# Altium PCB CW341_KintexUSTarget.PcbDoc (part 7 of 7)
Units mil, origin at the board's own origin, x right, y up, seen from the top; angles counter-clockwise.
Board outline 4566.97 x 5485 mil, 6 copper layers (Top Layer, Layer 2 (GND), Layer 3 (sig), Layer 4 (sig), Layer 5 (PWR), Bottom Layer), stack 61.068 mil thick; 157 components, 262 nets, 1869 pads, 1478 vias.
Unrouted connection lines stored in the file: 128.
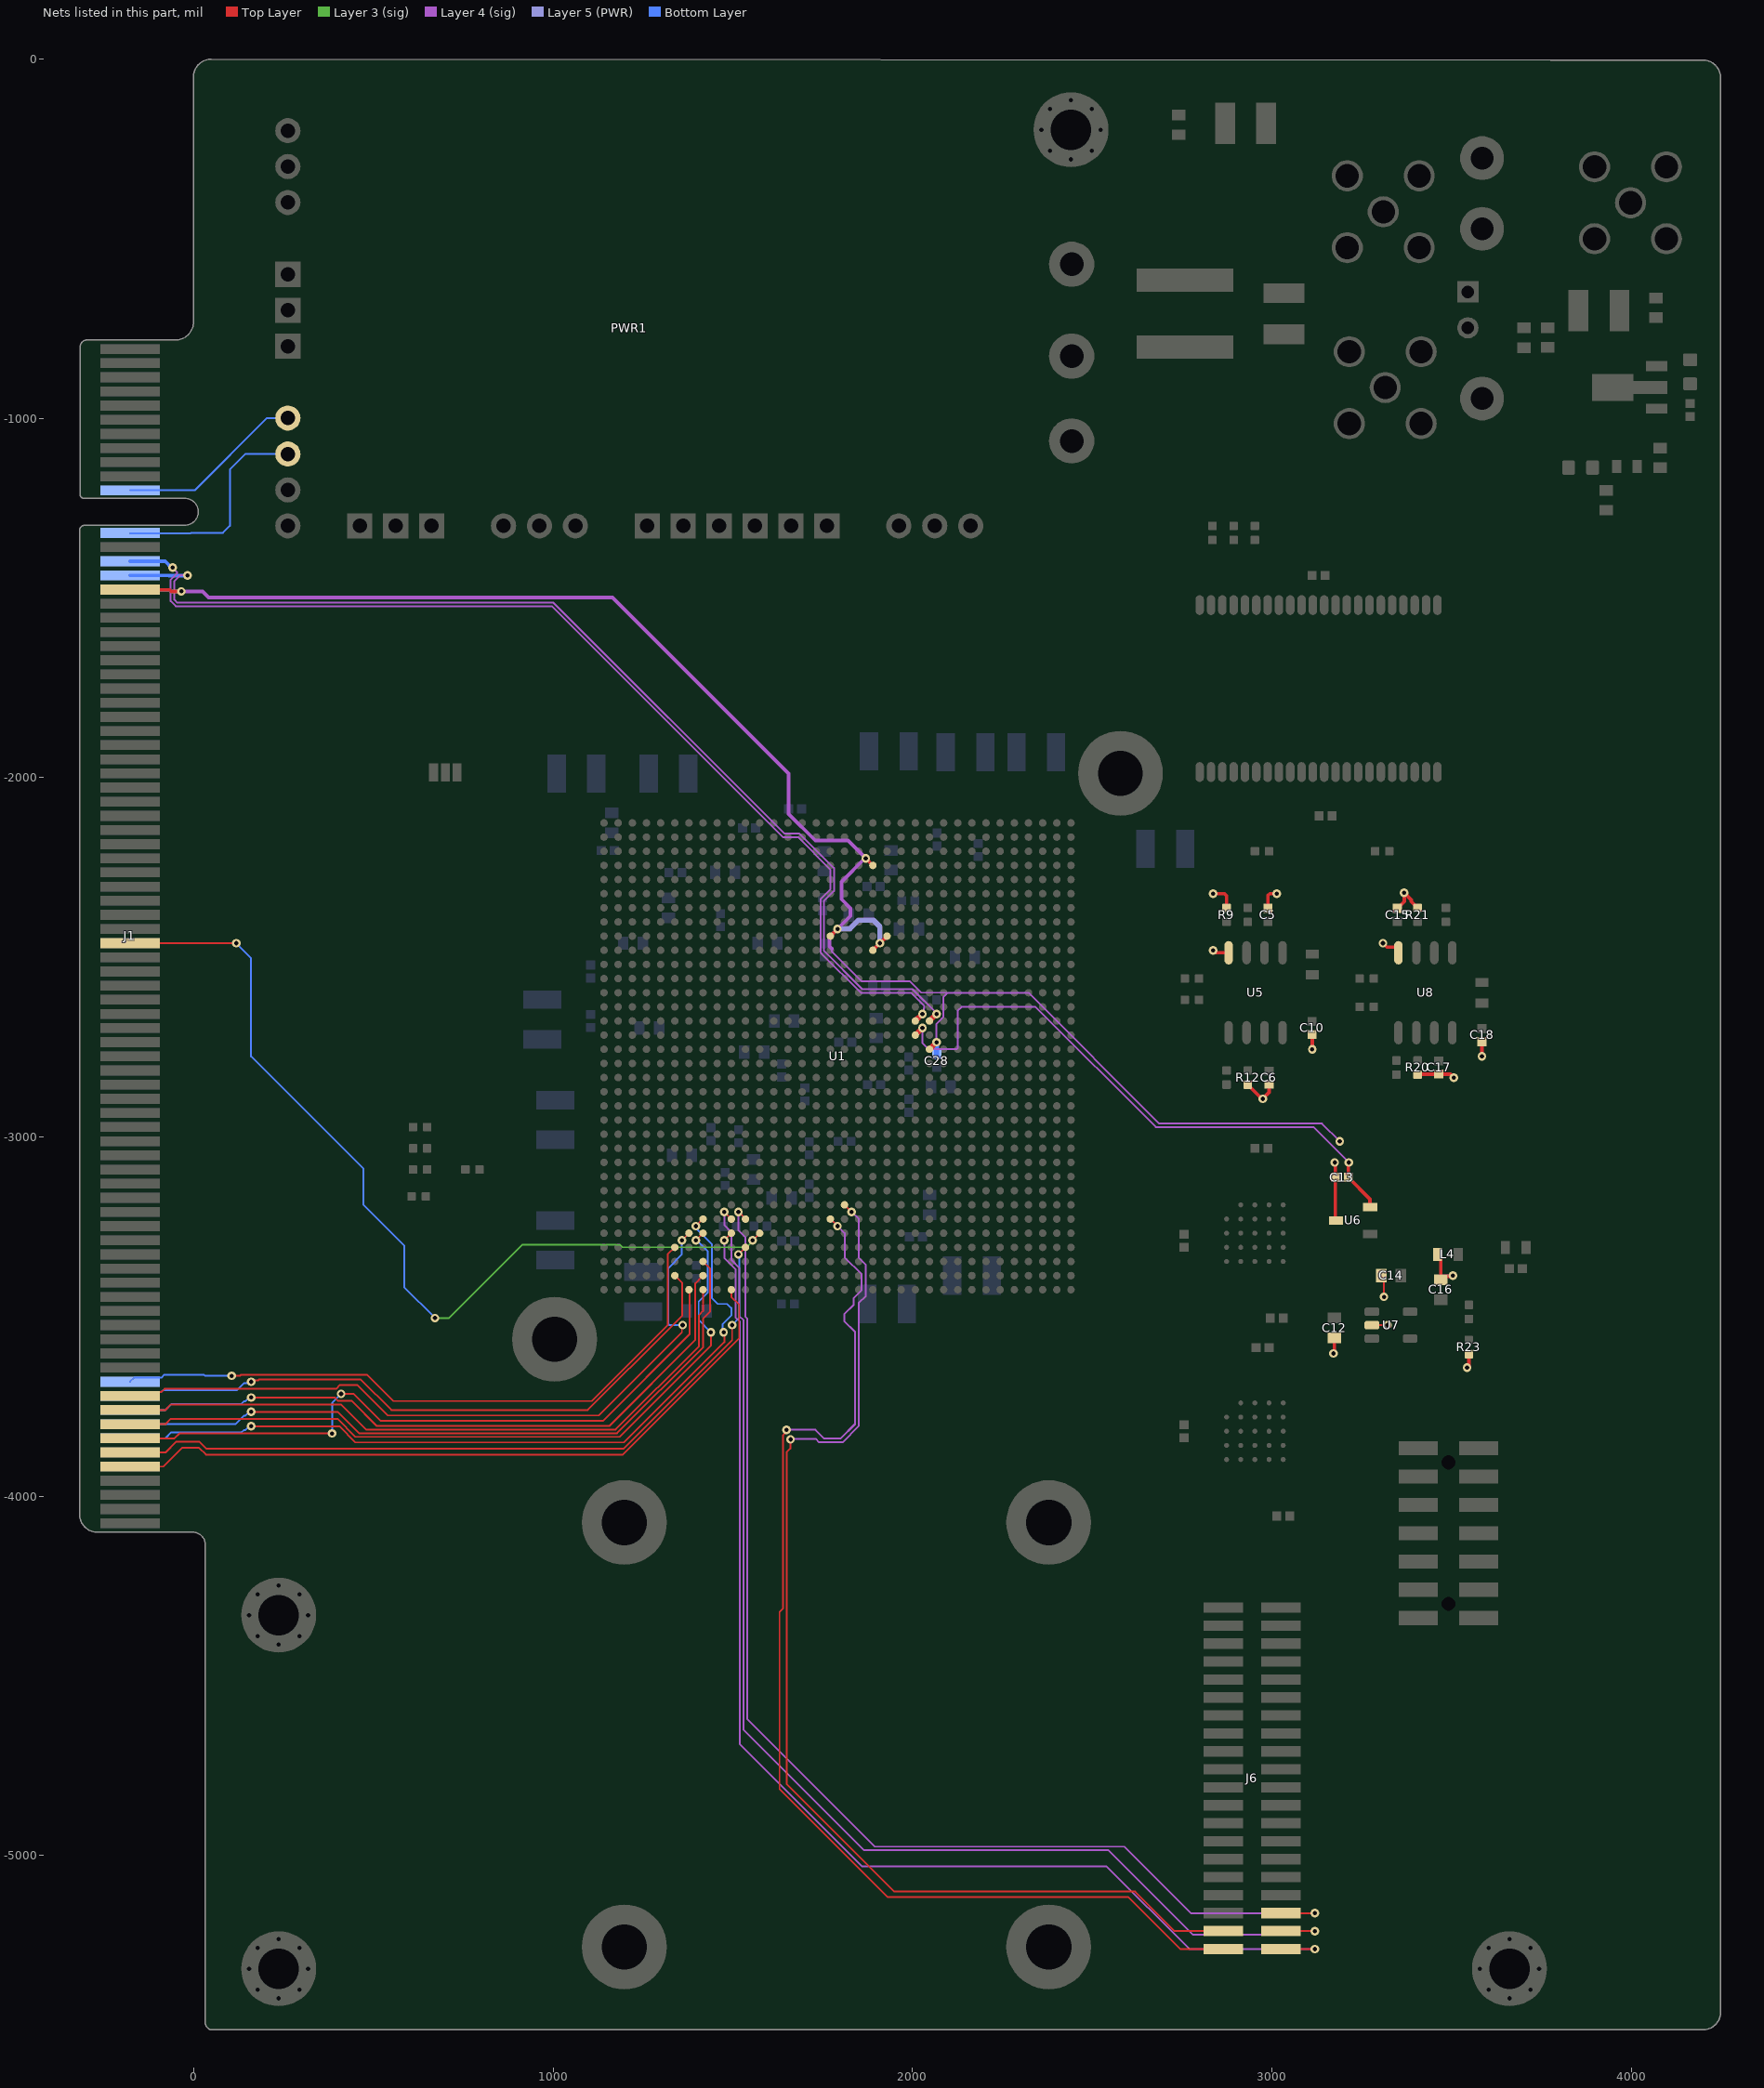
[diagram p10: the nets of this part, all layers, seen from the top]

## Via types
v1: diameter 24, hole 12, Top Layer to Bottom Layer, tented both sides, 1463 vias
v2: diameter 24, hole 10, Top Layer to Bottom Layer, tented both sides, 15 vias

## Nets (pads, with @x,y where several pads share a name; then routed paths per layer and width w, separated by ;. In a path a pad name is that pad's centre, name@x,y a point inside that pad or via, vN(x,y) a via of type N, cw(c..) or ccw(c..) an arc to the next point about the centre after c; other vN are vias at no path point) (continued)
USERIOA-36: J6.36 U1.F24 | length 3348.1
  Top Layer w5: v1(1515.75,-3208.66) U1.F24@1535.43,-3228.35 ; J6.36@3025,-5160 v1(3120,-5160)
  Layer 4 (sig) w5: v1(1515.75,-3208.66) 1515.75,-3259.82 1535.25,-3279.32 1535.25,-3364.75 1535,-3365 1535,-3500 1540,-3505 1540,-4620 1895,-4975 2590,-4975 2775,-5160 v1(3120,-5160)
USERIOA-37: J6.37 U1.G17 | length 3208.7
  Top Layer w5: v1(1660.73,-3841.74) 1660,-3842.47 1660,-3867.42 1650,-3877.42 1650,-4800 1950,-5100 2619.69,-5100 2729.69,-5210 J6.37@2865,-5210 ; U1.G17@1811.02,-3188.98 v1(1830.71,-3208.66)
  Layer 4 (sig) w5: v1(1660.73,-3841.74) 1662.47,-3840 1730.57,-3840 1740.07,-3849.5 1805.5,-3849.5 1850.21,-3804.79 1850.21,-3462.4 1870.08,-3442.53 1870.08,-3355.71 1850.58,-3336.21 1850.58,-3228.53 v1(1830.71,-3208.66)
USERIOA-38: J6.38 U1.F25 | length 3416.6
  Top Layer w5: v1(1476.38,-3208.66) U1.F25@1496.06,-3228.35 ; J6.38@3025,-5210 v1(3120,-5210)
  Layer 4 (sig) w5: v1(1476.38,-3208.66) 1476.38,-3245.49 1496.25,-3265.36 1496.25,-3342.47 1517.84,-3364.05 1517.84,-3497.84 1530,-3510 1530,-4650 1865,-4985 2545,-4985 2780,-5220 3062.5,-5220 3072.5,-5210 v1(3120,-5210)
USERIOA-39: J6.39 U1.F18 | length 3284.2
  Top Layer w5: v1(1649.5,-3815) 1649.5,-3820.14 1639.5,-3830.14 1639.5,-4312.82 1630,-4322.32 1630,-4815 1930,-5115 2600,-5115 2745,-5260 J6.39@2865,-5260 ; U1.F18@1771.65,-3228.35 v1(1791.34,-3248.03)
  Layer 4 (sig) w5: v1(1649.5,-3815) 1730,-3815 1754.5,-3839.5 1799.64,-3839.5 1840.21,-3798.93 1840.21,-3542.6 1810,-3512.4 1810,-3493.17 1836.55,-3466.61 1836.55,-3448.38 1858.47,-3426.46 1858.47,-3382.11 1811.21,-3334.85 1811.21,-3267.9 v1(1791.34,-3248.03)
USERIOA-40: J6.40 U1.E25 | length 3379.6
  Top Layer w5: v1(1476.38,-3287.4) U1.E25@1496.06,-3267.72 ; J6.40@3025,-5260 v1(3120,-5260)
  Layer 4 (sig) w5: v1(1476.38,-3287.4) 1476.38,-3336.74 1507.84,-3368.2 1507.84,-3501.98 1520,-3514.14 1520,-4690 1860,-5030 2540,-5030 2770,-5260 v1(3120,-5260)
USR_DBG_nRST: J1.B41 U1.E23 | length 2576.2
  Top Layer w5: J1.B41@-177.17,-2460.63 v1(118.11,-2460.63) ; v1(1555.12,-3287.4) U1.E23@1574.8,-3267.72
  Layer 3 (sig) w5: v1(671.38,-3503.94) 710.75,-3503.94 914.93,-3299.76 1185.57,-3299.76 1192.71,-3306.9 1537.71,-3306.9 1555.12,-3289.49 v1(1555.12,-3287.4)
  Bottom Layer w5: v1(118.11,-2460.63) 159.57,-2502.09 159.57,-2775.59 472.44,-3088.46 472.44,-3188.98 585.82,-3302.35 585.82,-3418.37 v1(671.38,-3503.94)
USRUSB_OE: J1.B77 U1.D24 | length 2096.5
  Top Layer w5: J1.B77@-177.17,-3877.95 -78.74,-3877.95 -49.37,-3848.58 -49.24,-3848.45 16.23,-3848.45 35.79,-3868.01 1195.62,-3868.01 1498.15,-3565.48 v1(1498.15,-3523.62) ; v1(1515.75,-3326.77) U1.D24@1535.43,-3307.09
  Bottom Layer w5: v1(1498.15,-3523.62) 1517.84,-3503.94 1517.84,-3328.86 v1(1515.75,-3326.77)
USRUSB_PWREN: J1.A72 U1.D29 | length 1849.2
  Top Layer w5: v1(105.5,-3664.67) 129.04,-3664.67 131.92,-3661.79 481.79,-3661.79 555,-3735 1107.52,-3735 1318.9,-3523.62 1318.9,-3326.77 U1.D29@1338.58,-3307.09
  Bottom Layer w5: J1.A72@-177.17,-3681.1 -165.89,-3669.82 -89.64,-3669.82 -81.42,-3661.6 28.58,-3661.6 31.64,-3664.67 v1(105.5,-3664.67)
USRUSB_RCV: J1.A76 U1.F27 | length 2220.6
  Top Layer w5: v1(159.5,-3805) 405,-3805 450,-3850 1197.26,-3850 1476.38,-3570.88 1476.38,-3545.19 v1(1474.49,-3543.31) ; v1(1397.64,-3248.03) U1.F27@1417.32,-3228.35
  Bottom Layer w5: J1.A76@-177.17,-3838.58 -78.74,-3838.58 -62.31,-3822.15 132.85,-3822.15 139.19,-3815.81 143.55,-3815.81 154.36,-3805 v1(159.5,-3805) ; v1(1397.64,-3248.03) 1397.64,-3253.17 1403.2,-3258.73 1403.2,-3260.05 1441.52,-3298.37 1441.52,-3447.56 1458.72,-3464.75 1484.46,-3464.75 1495.88,-3476.17 1495.88,-3496.93 1471.15,-3521.66 1471.15,-3539.97 v1(1474.49,-3543.31)
USRUSB_SOFTCN: J1.B75 U1.E27 | length 2109
  Top Layer w5: J1.B75@-177.17,-3799.21 -78.74,-3799.21 -64.03,-3784.5 400,-3784.5 450,-3834.5 1185.19,-3834.5 1439.1,-3580.59 v1(1439.1,-3543.31) ; v1(1397.64,-3287.4) U1.E27@1417.32,-3267.72
  Bottom Layer w5: v1(1397.64,-3287.4) 1399.73,-3287.4 1430.8,-3318.48 1430.8,-3432.06 1405.02,-3457.84 1405.02,-3509.23 v1(1439.1,-3543.31)
USRUSB_SPD: J1.B76 U1.A28 | length 1913.7
  Top Layer w5: J1.B76@-177.17,-3838.58 -53.51,-3838.58 -39.93,-3825 v1(385,-3825) ; v1(410,-3715) 445,-3715 520,-3790 1139.15,-3790 1379.86,-3549.3 1379.86,-3427.1 U1.A28@1377.95,-3425.2
  Bottom Layer w5: v1(385,-3825) 385,-3740 v1(410,-3715)
USRUSB_SUS: J1.B78 U1.A25 | length 2002.3
  Top Layer w5: J1.B78@-177.17,-3917.32 -84.54,-3917.32 -32.22,-3865 15,-3865 33.89,-3883.89 1193.89,-3883.89 1517.65,-3560.12 1517.65,-3466.47 1496.06,-3444.88 U1.A25@1496.06,-3425.2
USRUSB_VBUS_DETECT: J1.A73 U1.B29 | length 1819.6
  Top Layer w5: v1(159.5,-3681.29) 163.14,-3677.65 178.85,-3677.65 181.5,-3675 465,-3675 550,-3760 1096.66,-3760 1328.9,-3527.76 1328.9,-3527.5 1359.51,-3496.89 1359.51,-3406.75 U1.B29@1338.58,-3385.83
  Bottom Layer w5: J1.A73@-177.17,-3720.47 -165.89,-3709.19 -89.64,-3709.19 -84.49,-3704.04 120.96,-3704.04 140.08,-3684.92 155.86,-3684.92 v1(159.5,-3681.29)
USRUSB_VM: J1.A74 U1.B27 | length 1907.2
  Top Layer w5: v1(159.5,-3725) 392.42,-3725 401.92,-3734.5 440,-3734.5 509.6,-3804.1 1156.53,-3804.1 1395.89,-3564.74 1395.89,-3407.26 U1.B27@1417.32,-3385.83
  Bottom Layer w5: J1.A74@-177.17,-3759.84 -78.74,-3759.84 -62.31,-3743.41 131.59,-3743.41 139.19,-3735.81 143.55,-3735.81 154.36,-3725 v1(159.5,-3725)
USRUSB_VMO: J1.B74 U1.A27 | length 1876.1
  Top Layer w5: J1.B74@-177.17,-3759.84 -78.74,-3759.84 -63.4,-3744.5 410,-3744.5 479.6,-3814.1 1174.1,-3814.1 1405.89,-3582.32 1405.89,-3495.69 1417.32,-3484.25 U1.A27@1417.32,-3425.2
USRUSB_VP: J1.A75 U1.C27 | length 1987.4
  Top Layer w5: v1(159.5,-3765) 400.5,-3765 460,-3824.5 1177.85,-3824.5 1417.51,-3584.84 1417.51,-3504.93 1437.01,-3485.43 1437.01,-3366.14 U1.C27@1417.32,-3346.46
  Bottom Layer w5: J1.A75@-177.17,-3799.21 115.79,-3799.21 139.19,-3775.81 143.55,-3775.81 154.36,-3765 v1(159.5,-3765)
USRUSB_VPO: J1.B73 U1.E28 | length 2017.6
  Top Layer w5: J1.B73@-177.17,-3720.47 -165.89,-3709.19 -89.64,-3709.19 -81.24,-3700.79 396.64,-3700.79 407.42,-3690 455,-3690 540,-3775 1126.57,-3775 1358.45,-3543.12 1358.45,-3525.52 v1(1360.36,-3523.62) ; v1(1358.27,-3287.4) U1.E28@1377.95,-3267.72
  Bottom Layer w5: v1(1358.27,-3287.4) 1358.27,-3326.77 1320.51,-3364.53 1320.51,-3520.69 1323.44,-3523.62 v1(1360.36,-3523.62)
VCCINT_SCL: J1.A12 PWR1.8 | length 622.8
  Bottom Layer w5: J1.A12@-177.17,-1319.9 -8.58,-1319.9 -7.2,-1318.52 81.2,-1318.52 100.51,-1299.21 100.51,-1141.73 143.03,-1099.21 PWR1.8@261.93,-1099.21
VCCINT_SDA: J1.A11 PWR1.7 | length 522.2
  Bottom Layer w5: J1.A11@-177.17,-1199.87 3,-1199.87 203.66,-999.21 PWR1.7@261.93,-999.21
XADC_DX_N: J1.A15 U1.Y11 | length 3056.6
  Top Layer w15: U1.Y11@2047.24,-2677.17 v1(2066.93,-2657.48)
  Layer 4 (sig) w5: v1(-17.6,-1437.01) -37.89,-1437.01 -53.98,-1453.1 -53.98,-1504.59 -45.75,-1512.82 1001.01,-1512.82 1643.73,-2155.54 1685.45,-2155.54 1781.47,-2251.56 1781.47,-2315.37 1754.06,-2342.78 1754.06,-2482.18 1860.49,-2588.61 2000.41,-2588.61 2066.93,-2655.13 v1(2066.93,-2657.48)
  Bottom Layer w10: J1.A15@-177.17,-1437.01 -68.47,-1437.01 -68.05,-1437.43 -18.02,-1437.43 v1(-17.6,-1437.01) -17.25,-1437.35 v1@-17.25,-1437.43
XADC_DX_P: J1.A14 U1.Y12 | length 3020.9
  Top Layer w15: U1.Y12@2007.87,-2677.17 v1(2027.56,-2657.48)
  Layer 4 (sig) w5: v1(-58.94,-1415.43) -46.77,-1427.6 -46.77,-1431.74 -63.98,-1448.96 -63.98,-1508.73 -49.9,-1522.82 996.87,-1522.82 1639.59,-2165.54 1681.31,-2165.54 1771.47,-2255.7 1771.47,-2311.23 1744.06,-2338.64 1744.06,-2486.32 1746.99,-2489.25 1856.35,-2598.61 1996.27,-2598.61 2033.14,-2635.48 2033.14,-2640.48 2031.19,-2642.42 2031.19,-2653.85 v1(2027.56,-2657.48)
  Bottom Layer w10: J1.A14@-177.17,-1397.64 -79.33,-1397.64 -61.53,-1415.43 v1(-58.94,-1415.43)
XADC_VREF_N: C5.2 C6.2 C10.2 C12.2 C13.2 C14.2 C15.2 C16.2 C17.2 C18.2 C28.2 J1.A16 J1.B16 L4.2 R9.2 R12.2 R20.2 R21.2 R23.2 U1.AE15 U1.AF14 U1.AF18 U1.AL15 U1.V11 U5.4 U6.3 U7.2 U8.4 | length 6150.3
  Top Layer w5: U7.2@3275.53,-3523.63 U7.2@3278.49,-3523.63 v1(3321.79,-3523.63) ; C14.2@3304.08,-3385.84 3311.95,-3393.71 v1(3311.95,-3444.89)
  Top Layer w10: J1.B16@-177.17,-1476.38 -176.45,-1477.09 -66.48,-1477.09 -62.1,-1481.47 v1(-34.48,-1481.47) ; U1.AF18@1771.65,-2440.94 v1(1791.34,-2421.26) ; v1(1870.08,-2224.41) U1.AL15@1889.76,-2244.09 ; U1.AE15@1889.76,-2480.32 v1(1909.45,-2460.63) U1.AF14@1929.13,-2440.94 ; v1(2836.73,-2480.31) 2843.62,-2487.2 U5.4@2879.72,-2487.2 ; v1(2836.73,-2322.83) 2868.16,-2322.83 2874.02,-2328.69 R9.2@2874.02,-2362.2 ; R12.2@2933.07,-2854.33 2972.44,-2893.7 v1(2974.53,-2893.7) 2992.13,-2876.1 C6.2@2992.13,-2852.76 ; C5.2@2989.2,-2363.78 2989.2,-2327.85 2994.21,-2322.83 v1(3013.9,-2322.83) ; C10.2@3112.2,-2714.96 3112.2,-2755.79 v1(3112.32,-2755.91) ; v1(3171.38,-3602.36) 3174.16,-3599.59 C12.2@3174.16,-3559.07 ; v1(3174.92,-3070.87) 3176.5,-3072.44 C13.2@3176.5,-3112.32 3176.5,-3230.04 U6.3@3178.86,-3232.4 ; v1(3309.17,-2460.63) 3320.08,-2471.53 3345.87,-2471.53 3352.16,-2477.83 U8.4@3352.16,-2487.2 ; C15.2@3349.38,-2363.78 3368.23,-2344.93 v1(3368.23,-2320.46) 3368.23,-2320.02 3388.23,-2340.02 3388.23,-2344.92 R21.2@3405.51,-2362.2 ; R20.2@3405.51,-2826.49 3406.3,-2825.7 3463.78,-2825.7 C17.2@3464.57,-2824.91 3496.29,-2824.91 v1(3506.03,-2834.65) ; L4.2@3461.14,-3326.77 3461.14,-3332.28 3470.2,-3341.34 C16.2@3470.2,-3397.64 3479.96,-3387.87 3501.89,-3387.87 v1(3503.94,-3385.83) ; v1(3543.31,-3641.73) 3548.17,-3636.87 R23.2@3548.17,-3604.34 ; v1(3584.65,-2775.47) C18.2@3584.65,-2734.65
  Top Layer w15: U1.V11@2047.24,-2755.91 v1(2066.93,-2736.22)
  Layer 4 (sig) w5: 1775.78,-2476.19 1775.78,-2484.44 1857.77,-2566.43 1992.37,-2566.43 2024.18,-2598.24 2098.22,-2598.24 2098.41,-2598.43 ; v1(2066.93,-2736.22) 2066.93,-2685.06 2086.43,-2665.56 2086.43,-2610.4 2098.41,-2598.43 ; v1(3188.98,-3011.81) 3139.61,-2962.44 2686.85,-2962.44 2322.83,-2598.43 2098.41,-2598.43
  Layer 4 (sig) w10: v1(-34.48,-1481.47) 24.78,-1481.47 41.69,-1498.38 1165.66,-1498.38 1655.76,-1988.48 1655.76,-2101.05 1729.56,-2174.85 1820.52,-2174.85 v1(1870.08,-2224.41) 1868.15,-2224.41 1802.74,-2289.81 1802.74,-2338.44 1827.5,-2363.19 1827.5,-2385.1 v1(1791.34,-2421.26) 1769.34,-2443.26 1769.34,-2469.74 1775.78,-2476.19
  Layer 5 (PWR) w15: v1(1791.34,-2421.26) 1792.43,-2420.17 1825.84,-2420.17 1849.25,-2396.76 1891.21,-2396.76 1909.45,-2415 v1(1909.45,-2460.63)
  Bottom Layer w10: J1.A16@-177.17,-1476.38 -176.45,-1477.09 -66.48,-1477.09 -62.1,-1481.47 v1(-34.48,-1481.47)
  Bottom Layer w15: C28.2@2066.93,-2777.17 v1(2066.93,-2736.22)
XADC_VREF_P: C13.1 U1.W12 U6.2 | length 1702.4
  Top Layer w10: v1(3214.29,-3070.87) 3212.72,-3072.44 C13.1@3212.72,-3112.32 3273.35,-3172.95 U6.2@3273.35,-3195
  Top Layer w15: U1.W12@2007.87,-2716.54 v1(2027.56,-2696.85)
  Layer 4 (sig) w5: v1(2027.56,-2696.85) 2027.56,-2737.8 2045.48,-2755.72 2123.24,-2755.72 2126.17,-2752.79 2126.17,-2648.04 2136.42,-2637.8 2342.52,-2637.8 2677.17,-2972.44 3115.87,-2972.44 v1(3214.29,-3070.87)
pads on no net: FAN1.MH1 FAN1.MH2 FAN1.MH3 FAN1.MH4 HS1.13 HS1.14 J1.B24 J2.12 J2.14 J2.MH1 J2.MH2 MH1.1 MH2.1 MH4.1 MH6.1 PWR1.14 PWR1.15 PWR1.16 R1.0 R2.0 R3.0 R4.0 R5.0 R6.0 R7.0 R8.0 R9.0 R10.0 R11.0 R12.0 R13.0 R14.0 R15.0 R16.0 R17.0 R18.0 R19.0 R20.0 R21.0 R22.0 R23.0 R24.0 R25.0 R26.0 U1.A3 U1.A4 U1.A8 U1.A9 U1.A10 U1.A12 U1.A13 U1.A17 U1.A20 U1.A22 U1.A23 U1.A24 U1.A29 U1.AA3 U1.AA4 U1.AA6 U1.AA20 U1.AA22 U1.AA23 U1.AA24 U1.AA25 U1.AA27 U1.AA28 U1.AA29 U1.AA30 U1.AA32 U1.AA33 U1.AA34 U1.AB1 U1.AB2 U1.AB5 U1.AB6 U1.AB20 U1.AB21 U1.AB22 U1.AB24 U1.AB25 U1.AB26 U1.AB27 U1.AB29 U1.AB30 U1.AB31 U1.AB32 U1.AB34 U1.AC2 U1.AC3 U1.AC4 U1.AC6 U1.AC21 U1.AC22 U1.AC23 U1.AC24 U1.AC26 U1.AC27 U1.AC28 U1.AC29 U1.AC31 U1.AC32 U1.AC33 U1.AC34 U1.AD1 U1.AD2 U1.AD3 U1.AD5 U1.AD6 U1.AD8 U1.AD9 U1.AD10 U1.AD11 U1.AD13 U1.AD14 U1.AD15 U1.AD16 U1.AD18 U1.AD19 U1.AD23 U1.AD24 U1.AD25 U1.AD26 U1.AD28 U1.AD29 U1.AD30 U1.AD31 U1.AD33 U1.AD34 U1.AE3 U1.AE4 U1.AE6 U1.AE8 U1.AE10 U1.AE11 U1.AE12 U1.AE13 U1.AE17 U1.AE22 U1.AE27 U1.AE28 U1.AE30 U1.AE31 U1.AE32 U1.AE33 U1.AF1 U1.AF2 U1.AF5 U1.AF6 U1.AF8 U1.AF9 U1.AF10 U1.AF12 U1.AF13 U1.AF17 U1.AF19 U1.AF25 U1.AF27 U1.AF28 U1.AF29 U1.AF30 U1.AF32 U1.AF33 U1.AF34 U1.AG2 U1.AG3 U1.AG4 U1.AG6 U1.AG9 U1.AG10 U1.AG11 U1.AG12 U1.AG14 U1.AG15 U1.AG16 U1.AG17 U1.AG19 U1.AG21 U1.AG26 U1.AG27 U1.AG29 U1.AG30 U1.AG31 U1.AG32 U1.AG34 U1.AH1 U1.AH2 U1.AH3 U1.AH5 U1.AH6 U1.AH8 U1.AH9 U1.AH11 U1.AH12 U1.AH13 U1.AH14 U1.AH16 U1.AH17 U1.AH18 U1.AH19 U1.AH29 U1.AJ3 U1.AJ4 U1.AJ6 U1.AJ8 U1.AJ9 U1.AJ10 U1.AJ11 U1.AJ13 U1.AJ14 U1.AJ15 U1.AJ16 U1.AJ18 U1.AJ19 U1.AJ21 U1.AJ26 U1.AJ28 U1.AJ30 U1.AJ31 U1.AK1 U1.AK2 U1.AK5 U1.AK6 U1.AK8 U1.AK10 U1.AK11 U1.AK13 U1.AK16 U1.AK17 U1.AK18 U1.AK23 U1.AK25 U1.AK28 U1.AK32 U1.AK33 U1.AL2 U1.AL3 U1.AL4 U1.AL6 U1.AL14 U1.AL17 U1.AL18 U1.AL19 U1.AL28 U1.AL29 U1.AM1 U1.AM2 U1.AM3 U1.AM5 U1.AM6 U1.AM9 U1.AM14 U1.AM15 U1.AM16 U1.AM17 U1.AM19 U1.AM22 U1.AM24 U1.AM25 U1.AM29 U1.AM31 U1.AM32 U1.AN3 U1.AN4 U1.AN6 U1.AN14 U1.AN16 U1.AN17 U1.AN18 U1.AN19 U1.AN24 U1.AN31 U1.AP1 U1.AP2 U1.AP14 U1.AP15 U1.AP16 U1.AP18 U1.AP19 U1.AP25 U1.B1 U1.B2 U1.B5 U1.B6 U1.B9 U1.B10 U1.B11 U1.B12 U1.B13 U1.B17 U1.B21 U1.B22 U1.B24 U1.B25 U1.B26 U1.B31 U1.B32 U1.C2 U1.C3 U1.C4 U1.C6 U1.C8 U1.C9 U1.C10 U1.C11 U1.C12 U1.C13 U1.C16 U1.C17 U1.C21 U1.C22 U1.C26 U1.C28 U1.C29 U1.C32 U1.C33 U1.C34 U1.D1 U1.D2 U1.D3 U1.D5 U1.D6 U1.D8 U1.D9 U1.D10 U1.D11 U1.D13 U1.D25 U1.D26 U1.D28 U1.D31 U1.D32 U1.D33 U1.E3 U1.E4 U1.E6 U1.E8 U1.E10 U1.E11 U1.E12 U1.E13 U1.E21 U1.E26 U1.E31 U1.E33 U1.E34 U1.F1 U1.F2 U1.F5 U1.F6 U1.F8 U1.F9 U1.F10 U1.F11 U1.F12 U1.F13 U1.F22 U1.F30 U1.F31 U1.F32 U1.G2 U1.G3 U1.G4 U1.G6 U1.G8 U1.G9 U1.G10 U1.G11 U1.G12 U1.G24 U1.G25 U1.G27 U1.G29 U1.G30 U1.G32 U1.G33 U1.G34 U1.H1 U1.H2 U1.H3 U1.H5 U1.H6 U1.H8 U1.H9 U1.H11 U1.H12 U1.H13 U1.H14 U1.H16 U1.H21 U1.H22 U1.H23 U1.H27 U1.H29 U1.H31 U1.H32 U1.H33 U1.J3 U1.J4 U1.J6 U1.J8 U1.J9 U1.J10 U1.J11 U1.J12 U1.J13 U1.J20 U1.J21 U1.J23 U1.J24 U1.J25 U1.J29 U1.J30 U1.J31 U1.J33 U1.J34 U1.K1 U1.K2 U1.K5 U1.K6 U1.K8 U1.K9 U1.K10 U1.K11 U1.K12 U1.K13 U1.K22 U1.K25 U1.K27 U1.K29 U1.K31 U1.K32 U1.K33 U1.L2 U1.L3 U1.L4 U1.L6 U1.L8 U1.L9 U1.L10 U1.L12 U1.L13 U1.L14 U1.L17 U1.L22 U1.L23 U1.L24 U1.L27 U1.L29 U1.L30 U1.L32 U1.L33 U1.L34 U1.M1 U1.M2 U1.M3 U1.M5 U1.M6 U1.M21 U1.M25 U1.M26 U1.M29 U1.M31 U1.M32 U1.N3 U1.N4 U1.N6 U1.N21 U1.N23 U1.N26 U1.N29 U1.N30 U1.N31 U1.N33 U1.N34 U1.P1 U1.P2 U1.P5 U1.P6 U1.P24 U1.P26 U1.P29 U1.P31 U1.P32 U1.P33 U1.R2 U1.R3 U1.R4 U1.R6 U1.R29 U1.R30 U1.R32 U1.R33 U1.R34 U1.T1 U1.T2 U1.T3 U1.T5 U1.T6 U1.T22 U1.T23 U1.T27 U1.T31 U1.T32 U1.U3 U1.U4 U1.U6 U1.U21 U1.U22 U1.U24 U1.U25 U1.U26 U1.U27 U1.U29 U1.U34 U1.V1 U1.V2 U1.V5 U1.V6 U1.V12 U1.V21 U1.V22 U1.V23 U1.V24 U1.V26 U1.V27 U1.V28 U1.V29 U1.V31 U1.V32 U1.V33 U1.V34 U1.W2 U1.W3 U1.W4 U1.W6 U1.W11 U1.W21 U1.W23 U1.W24 U1.W25 U1.W26 U1.W28 U1.W29 U1.W30 U1.W31 U1.W33 U1.W34 U1.Y1 U1.Y2 U1.Y3 U1.Y5 U1.Y6 U1.Y21 U1.Y22 U1.Y23 U1.Y25 U1.Y26 U1.Y27 U1.Y28 U1.Y30 U1.Y31 U1.Y32 U1.Y33 U3.A2 U3.A5 U3.B5 U3.C2 U3.C5 U4.A2 U4.A5 U4.B5 U4.C2 U4.C5

## Polygon pours and split planes (outlines as drawn)
GND on Top Layer "GND_L01_P014" (solid, remove dead copper, pour order 14): 1.13,1.13 4370.08,1.13 4370.08,-5490.99 20.82,-5490.99 20.82,-4110.13 9.55,-4098.87 -254.68,-4098.87 -254.68,-783.83 -216,-745.16 -1.13,-745.16 -1.13,-1.13
+VCCIOB on Top Layer "+VCCIOB_L01_P008" (solid, pour order 8): -94.49,-1214.57 -259.84,-1214.57 -259.84,-1187.01 -94.49,-1187.01 -68.9,-1161.42 59.06,-1161.42 118.11,-1220.47 118.11,-1358.27 137.79,-1377.95 196.85,-1377.95 236.22,-1417.32 236.22,-1476.38 216.54,-1496.06 59.06,-1496.06 39.37,-1476.38 39.37,-1240.16 13.78,-1214.57
NetJ3_1 on Top Layer "NETJ3_1_L01_P005" (solid, pour order 5): 2344.61,-708.66 3092.64,-708.66 3112.32,-728.35 3112.32,-846.46 3033.58,-925.2 2344.61,-925.2 2324.92,-905.51 2324.92,-728.35
+1V0_VCCINT_SHUNTLOW on Top Layer "+1V0_VCCINT_SHUNTLOW_L01_P004" (solid, pour order 4): 2325.66,-473.04 2345.95,-452.76 2994.21,-452.76 3112.32,-570.87 3112.32,-696.85 3100.51,-708.66 2344.61,-708.66 2324.92,-688.98 2324.92,-472.44
+5V on Top Layer "+5V_L01_P000" (solid, pour order 0): -273.5,-866.14 21.77,-866.14 21.77,-137.79 61.14,-98.42 356.42,-98.42 356.42,-905.51 317.05,-944.88 41.46,-944.88 -37.28,-1023.62 -273.5,-1023.62
GND on Bottom Layer "GND_L06_P015" (solid, remove dead copper, pour order 15): 0,0 4370.08,0 4370.08,-5492.13 21.77,-5492.13 21.77,-4111.26 10.51,-4100 -253.72,-4100 -253.72,-784.96 -215.05,-746.29 -0.18,-746.29 -0.18,-0.18
+1V0_VCCINT on Bottom Layer "+1V0_VCCINT_L06_P001" (solid, pour order 1): 2659.57,-984.25 2659.57,-1948.82 2718.62,-2007.87 2718.62,-2821.38 2518.03,-3021.97 1899.56,-3021.97 1867.39,-3021.97 1741.9,-2896.48 1741.9,-2701.81 1780.29,-2663.42 1780.29,-2579.8 1885.16,-2474.93 2251.56,-2474.93 2344.61,-2381.89 2344.61,-984.25
GND on Bottom Layer "GND_L06_P013" (solid, pour order 13): -63.05,-793.33 -58.03,-798.35 48.1,-798.35 118.11,-728.35 118.11,-531.5 314.96,-531.5 334.65,-551.18 314.96,-570.87 314.96,-905.51 295.28,-925.2 98.43,-925.2 39.37,-866.14 -59.06,-866.14
XADC_VREF_N on Bottom Layer "XADC_VREF_N_L06_P012" (solid, pour order 12): 3582.68,-2283.46 3740.16,-2440.94 3740.16,-3248.03 3799.21,-3307.09 3799.21,-3720.47 3740.16,-3779.53 3110.24,-3779.53 3070.87,-3740.16 3070.87,-2952.76 3031.5,-2913.39 2775.59,-2913.39 2755.91,-2893.7 2775.59,-2874.02 2775.59,-2303.15 2795.28,-2283.46
NetJ3_1 on Bottom Layer "NETJ3_1_L06_P003" (solid, pour order 3): 2994.21,-944.88 3072.95,-1023.62 3663.51,-1023.62 3702.88,-984.25 3702.88,-748.03 3663.51,-708.66 2364.29,-708.66 2324.92,-748.03 2324.92,-905.51 2364.29,-944.88
+1V0_VCCINT_SHUNTLOW on Bottom Layer "+1V0_VCCINT_SHUNTLOW_L06_P002" (solid, pour order 2): 1872.17,-1377.95 2305.24,-1377.95 2305.24,-708.66 2324.92,-688.98 3663.51,-688.98 3702.88,-649.61 3702.88,-413.39 3624.14,-334.65 1990.28,-334.65 1872.17,-452.76
GND on Layer 3 (sig) "GND_L03_P018" (solid, remove dead copper, pour order 18): 0,0 4370.08,0 4370.08,-5492.12 21.78,-5492.12 21.78,-4111.26 10.51,-4100 -253.72,-4100 -253.72,-784.96 -215.04,-746.29 -0.17,-746.29 -0.17,-0.17
+1V85_XADC_VCC on Layer 3 (sig) "+1V85_XADC_VCC_L03_P011" (solid, pour order 11): 3602.36,-2401.57 3641.73,-2440.94 3641.73,-3070.87 3562.99,-3070.87 3346.46,-3287.4 3228.35,-3287.4 2834.65,-2893.7 2834.65,-2559.06 2992.13,-2401.57
+VCCIOB on Layer 3 (sig) "+VCCIOB_L03_P009" (solid, pour order 9): 59.06,-1377.95 1673.23,-1377.95 1712.6,-1417.32 1712.6,-1594.49 1673.23,-1633.86 1555.12,-1633.86 1437.01,-1515.75 59.06,-1515.75 39.37,-1496.06 39.37,-1397.64
GND on Layer 4 (sig) "GND_L04_P017" (solid, remove dead copper, pour order 17): 0,0 4370.08,0 4370.08,-5492.13 21.77,-5492.13 21.77,-4111.26 10.51,-4100 -253.72,-4100 -253.72,-784.96 -215.05,-746.29 -0.18,-746.29 -0.18,-0.18
+VCCIOB on Layer 4 (sig) "+VCCIOB_L04_P010" (solid, pour order 10): 2263.78,-2440.94 2263.78,-2185.04 2145.67,-2066.93 2145.67,-1358.27 1535.43,-1358.27 1535.43,-1614.17 1555.12,-1633.86 1751.97,-1633.86 1948.82,-1830.71 1948.82,-2440.94
GND on Layer 5 (PWR) "GND_L05_P016" (solid, remove dead copper, pour order 16): 0,0 4330.71,0 4330.71,-5492.13 21.77,-5492.13 21.77,-4111.26 10.51,-4100 -253.72,-4100 -253.72,-784.96 -215.05,-746.29 -0.18,-746.29 -0.18,-0.18
+1V8 on Layer 5 (PWR) "+1V8_L05_P007" (solid, pour order 7): -78.74,-1023.62 2874.02,-1023.62 3405.51,-1555.12 3405.51,-2389.96 3374.21,-2421.26 3058.49,-2421.26 3011.81,-2467.93 3011.81,-3444.88 3095.2,-3755.2 3735,-3770 3735,-4330 3210,-5290 2630,-5290 2495,-5130 1900,-5130 1450,-4745 1465,-3965 1469.52,-3729.89 1102.36,-3622.05 964.57,-3484.25 964.57,-3110.24 787.4,-2933.07 570.87,-2933.07 137.8,-2500 137.8,-1161.42 39.37,-1161.42 -19.69,-1102.36 -78.74,-1102.36
GND on Layer 2 (GND) "GND_L02_P006" (solid, pour order 6): 0,0 4409.45,0 4409.45,-5492.13 21.77,-5492.13 21.77,-4111.26 10.51,-4100 -253.72,-4100 -253.72,-784.96 -215.05,-746.29 -0.18,-746.29 -0.18,-0.18

## Other copper
Top Layer:
  region net GND: 3947.61,-779.24 3872.41,-779.24 3872.41,-992.68 3947.61,-992.68
  region net GND: 4110.53,-951.54 4110.53,-876.35 3897.08,-876.35 3897.08,-951.54
  rectangle net GND: 3889.62,-1011.81 4023.62,-783.46
  pour cut-out: 1134.36,-2075.07 cw(c1158.36,-2099.08) 1158.36,-2065.12 2466.77,-2065.12 cw(c2466.77,-2069.69) 2470,-2066.46 cw(c2452.1,-2084.36) 2477.41,-2084.36 2477.41,-3381.84 cw(c2435.88,-3381.84) 2465.25,-3411.21 2460,-3416.46 1130,-3416.46 1130,-2091.65 cw(c1143.58,-2091.65) 1133.98,-2082.04
  pour cut-out: 2844.48,-3149.87 2844.48,-3395 3065,-3395 3065,-3150
  pour cut-out: 2840,-3705 2840,-3950.13 3060.52,-3950.13 3060.52,-3705.13

## Silkscreen, mask and mechanical layers (free items; w line width, h text height)
Top Overlay:
  drawing of 13 lines, arcs and shapes, not listed
  text "AMPLIFIED" at 3887,-247 h25
  text "SHUNT HIGHSIDE" at 3217.02,-271.69 h25
  text "SHUNT LOWSIDE" at 3218.02,-748.69 h25
  text "CW341" at 1212.85,-3643.13 h120
  text "Kintex UltraScale / KU095" at 1655.43,-3720 h120
Bottom Overlay:
  drawing of 35 lines, arcs and shapes, not listed
  text "VCC-INT Caps" at 2911.42,-2800.66 h80
  text "REV: 05" at 3344.95,-4324.5 h80
  text "W" at 3130,-5080 h450
  text "p" at 3575,-5105 h450
  text "C" at 3190,-5365 h450
Mechanical 1:
  lines w10: -316.43,-801.77 cw(c-296.43,-801.77) -296.43,-781.77 -50.85,-781.77 ccw(c-50.85,-731.77) -0.85,-731.77 ; -316.32,-799.67 -316.32,-1212 ccw(c-305.83,-1211.87) -305.7,-1222.37 -25.45,-1222.37 ; -24.66,-1222.58 cw(c-24.66,-1259.98) -24.66,-1297.38 -302.83,-1297.4 ccw(c-302.83,-1312.4) -317.83,-1312.4 -317.83,-4050 ccw(c-267.83,-4050) -267.83,-4100 -2.83,-4100 cw(c-2.83,-4135) 32.17,-4135 32.17,-5465 ccw(c52.17,-5465) 52.17,-5485 ; -0.73,-729.32 -0.73,-50 cw(c49.27,-50) 49.27,0 ; 47.17,0 3774.93,-2.83 4199.14,-2.83 cw(c4199.14,-52.83) 4249.14,-52.83 4249.14,-71.39 4249.14,-4651.31 4249.14,-5435 cw(c4199.14,-5435) 4199.14,-5485 3767.17,-5485 53.17,-5485
FAB NOTES:
  drawing of 193 lines, arcs and shapes, not listed
  text "DWG. NO." at 9342.29,6658.14 h75
  text "SH" at 12132.29,6658.14 h75
  text "REV." at 12677.29,6658.14 h75
  text "1" at -1771.38,6548.14 h70
  text "2" at 1554.29,6548.14 h70
  text "3" at 4884.29,6548.14 h70
  text "4" at 8219.29,6548.14 h70
  text "6" at 14879.29,6548.14 h70
  text "/" at 12287.29,6483.14 h100
  text "/" at 12287.29,6483.14 h100
  text "ZONE" at 9402.29,6018.14 h75
  text "REV." at 9887.29,6018.14 h75
  text "DESCRIPTION" at 11827.29,6018.14 h75
  text "DATE" at 14677.29,6018.14 h75
  text "APPROVED" at 15452.29,6018.14 h75
  text "A" at -3292.71,4770.14 h70
  text "A" at 16407.29,4770.14 h70
  text "NOTES: (UNLESS OTHERWISE SPECIFIED)" at 8595.35,4740.34 h100
  text "1 - VENDOR TO MANUFACTURE BOARDS PER THIS DRAWING USING THE TOOLING PROVIDED" at 8595.35,4540.34 h100
  text "PER IPC 6012 CLASS 2. BOARDS TO BE MANUFACTURED IN ACCORDANCE WITH UL-94V0" at 8595.35,4340.34 h100
  text "2 - THE GERBER FILES MUST BE CROSS REFERENCED TO THE PROVIDED TEST DATA" at 8595.35,3940.34 h100
  text "(IN IPC-D-356 FORMAT) PRIOR TO TOOLING THIS JOB FOR FABRICATION. ALL" at 8595.35,3740.34 h100
  text "KNOWN DISCREPANCIES ARE DOCUMENTED IN THE INTENTIONAL SHORTS.TXT. IF ADDITIONAL" at 8595.35,3540.34 h100
  text "DISCREPANCIES ARE FOUND, CONTACT CUSTOMER PRIOR TO PROCEEDING." at 8595.35,3340.34 h100
  text "3 - ALL FINISHED BOARDS TO BE SUBJECTED TO 100 PERCENT CONTINUITY AND" at 8595.35,3140.34 h100
  text "ISOLATION ELECTRICAL TEST. TEST FIXTURES TO BE GENERATED FROM THE" at 8595.35,2940.34 h100
  text "SECTION A-A" at -1919.17,2790.58 h125
  text "IPC-D-356 FORMATTED DATA, CROSS REFERENCED TO GERBER EXTRACTED" at 8595.35,2740.34 h100
  text "EDGE-FINGER PROFILE VIEW" at -1793.17,2669.58 h50
  text "NETLIST DATA." at 8595.35,2540.34 h100
  text "4 - MATERIAL RoHS COMPLIANT: TETRA- OR MULTI-FUNCTIONAL FR-4 LAMINATES AND" at 8595.35,2340.34 h100
  text "PER IPC-4101. MINIMUM GLASS TRANSITION TEMPERATURES (Tg) OF" at 8595.35,2140.34 h100
  text "170 DEGREES C REQUIRED." at 8595.35,1940.34 h100
  text "20" at -967.87,1821.13 h50
  text "5" at -772.87,1821.13 h50
  text "5 - TOLERANCES: .XXX = +/- .005 INCHES, .XX = +/- .01 INCHES UNLESS" at 8595.35,1765.34 h100
  text "0.051" at -2313.62,1651.13 h50
  text ".010" at -2021.62,1651.13 h50
  text "OTHERWISE SPECIFIED." at 8595.35,1565.34 h100
  text "6 - FINISHED OVERALL BOARD THICKNESS TO BE .062 INCHES +/- 10 PERCENT." at 8595.35,1365.34 h100
  text "7 - ALL HOLE SIZES ARE AFTER PLATING. ALL HOLE SIZES ARE +/- .004" at 8595.35,1165.34 h100
  text "0.062" at -1045.62,1126.13 h50
  text "ACROSS PADS" at -1045.62,1051.13 h50
  text "B" at -3292.71,1020.14 h70
  text "B" at 16407.29,1020.14 h70
  text "INCHES UNLESS OTHERWISE SPECIFIED. ALL PLATED THROUGH HOLES SHALL" at 8595.35,965.34 h100
  text "HAVE A MINIMUM COPPER BARREL THICKNESS OF .001 INCHES." at 8595.35,765.34 h100
  text "8 - ALL EXPOSED SURFACES TO BE COVERED WITH ENIG PER IPC-4552." at 8595.35,565.34 h100
  text "9 - MINIMUM ANNULAR RING TO BE .002 INCHES ON THE OUTER LAYERS AND .001" at 8595.35,365.34 h100
  text "INCHES ON THE INNER LAYERS." at 8595.35,165.34 h100
  text "10- NO IMPEDANCE TESTING OR COUPONS REQUIRED." at 8594.32,-60.84 h100
  text "11- LIQUID PHOTOIMAGEABLE GREEN SOLDERMASK OVER BARE COPPER ON BOTH SIDES OF THE BOARD." at 8595.35,-259.66 h100
  text "SOLDERMASK REGISTRATION TO BE WITHIN +/- .002 INCHES OF ITS RESPECTIVE CIRCUIT" at 8595.35,-459.66 h100
  text "LAYER AND THERE IS TO BE NO MASK ON ANY PAD AREA OR IN ANY HOLE. SOLDERMASK" at 8595.35,-659.66 h100
  text "DESIGNED TO PARTIALLY OVERLAY VIA PADS." at 8595.35,-859.66 h100
  text "12- SILKSCREEN USING WHITE NON-CONDUCTIVE INK AFTER SOLDERMASK IS APPLIED." at 8595.35,-1059.66 h100
  text "THERE IS TO BE NO SILKSCREEN ON ANY PAD AREA OR IN ANY HOLE." at 8595.35,-1259.66 h100
  text "13- BOW AND TWIST SHALL NOT EXCEED A MAXIMUM OF 0.75% FOR SURFACE MOUNT BOARDS" at 8595.35,-1459.66 h100
  text "AND 1.5% FOR ALL OTHER BOARD TECHNOLOGIES." at 8595.35,-1659.66 h100
  text "14- TOOLING PROVIDED (ALL VIEWED FROM COMPONENT SIDE):" at 8584.77,-1850.39 h100
  text "A" at -519.19,-1900.94 h118.11
  text "A" at -164.19,-1900.94 h118.11
  text "15. BEVELED PCIe EDGE CONNECTOR SEE SECTION A-A" at 8584.77,-2086.61 h100
  text "4 ARTWORK ETCH LAYERS" at 8595.35,-2571.47 h100
  text "C" at -3292.71,-2729.86 h70
  text "2 ARTWORK SILKSCREEN LAYERS" at 8595.35,-2771.47 h100
  text "C" at 16407.29,-2929.86 h70
  text "ALL ARTWORK FILES IN GERBER FORMAT" at 8595.35,-2971.47 h100
  text "DRILL DATA IN XL-3, ASCII 2.5 FORMAT" at 8595.35,-3171.47 h100
  text "FABRICATION DRAWING IN GERBER AND PDF FORMAT" at 8595.35,-3371.47 h100
  text "TEST DATA IN IPC-D-356 FORMAT" at 8595.35,-3571.47 h100
  text "CONTRACT NO." at 8877.29,-5616.86 h75
  text "COMPANY NAME" at 11377.29,-5616.86 h75
  text "NewAE Technology" at 11937.29,-5936.86 h225
  text "APPROVALS" at 9177.29,-6216.86 h75
  text "DATE" at 10727.29,-6216.86 h75
  text "D" at -3292.71,-6479.86 h70
  text "D" at 16407.29,-6479.86 h70
  text "DRAWN" at 8877.29,-6491.86 h75
  text "CHECKED" at 8877.29,-6891.86 h75
  text "FMSLSR" at 11444.14,-6940.01 h200
  text "ISSUED" at 8877.29,-7291.86 h75
  text "SIZE" at 11352.29,-7291.86 h75
  text "FSCM NO." at 11777.29,-7291.86 h75
  text "DWG. NO." at 13077.29,-7291.86 h75
  text "REV." at 15892.29,-7291.86 h75
  text "CW341" at 13769.14,-7550.01 h250
  text "'.FAB_REVISION'" at 15819.14,-7550.01 h200
  text "C" at 11377.29,-7616.86 h250
  text "SCALE" at 11377.29,-7866.86 h75
  text "1:1" at 11957.29,-7866.86 h100
  text "1" at -1771.38,-8151.86 h70
  text "2" at 1554.29,-8151.86 h70
  text "3" at 4884.29,-8151.86 h70
  text "4" at 8219.29,-8151.86 h70
  text "5" at 11544.29,-8151.86 h70
  text "6" at 14879.29,-8151.86 h70
Drill Drawing:
  circle w10: c-2419.06,5151.58 r33.33
  circle w10: c-2419.06,5001.58 r20
  circle w10: c-2419.06,5001.58 r33.33
  lines w10: -2452.39,4251.58 -2419.06,4218.25 -2385.73,4251.58 -2419.06,4284.91 -2452.39,4251.58 ; -2452.39,4434.91 -2385.73,4434.91 -2419.06,4368.25 -2452.39,4434.91 ; -2452.39,4534.91 -2435.73,4534.91 -2419.06,4518.25 -2402.39,4534.91 -2385.73,4534.91 -2402.39,4551.58 -2385.73,4568.25 -2402.39,4568.25 -2419.06,4584.91 -2435.73,4568.25 -2452.39,4568.25 -2435.73,4551.58 -2452.39,4534.91 ; -2452.39,4668.25 -2385.73,4668.25 -2385.73,4734.91 -2452.39,4734.91 -2452.39,4668.25 ; -2452.39,4818.25 -2452.39,4834.91 -2435.73,4851.58 -2452.39,4868.25 -2452.39,4884.91 -2435.73,4884.91 -2419.06,4868.25 -2402.39,4884.91 -2385.73,4884.91 -2385.73,4868.25 -2402.39,4851.58 -2385.73,4834.91 -2385.73,4818.25 -2402.39,4818.25 -2419.06,4834.91 -2435.73,4818.25 -2452.39,4818.25 ; -2452.39,5268.25 -2385.73,5268.25 -2385.73,5334.91 -2452.39,5334.91 -2452.39,5268.25 ; -2452.39,5484.91 -2385.73,5484.91 -2419.06,5418.25 -2452.39,5484.91 ; -2452.39,5584.91 -2435.73,5584.91 -2435.73,5568.25 -2402.39,5568.25 -2402.39,5584.91 -2385.73,5584.91 -2385.73,5618.25 -2402.39,5618.25 -2402.39,5634.91 -2435.73,5634.91 -2435.73,5618.25 -2452.39,5618.25 -2452.39,5584.91 ; -2452.39,5718.25 -2419.06,5734.91 -2385.73,5718.25 -2402.39,5751.58 -2385.73,5784.91 -2419.06,5768.25 -2452.39,5784.91 -2435.73,5751.58 -2452.39,5718.25 ; -2439.06,4681.58 -2399.06,4681.58 -2399.06,4721.58 -2439.06,4721.58 -2439.06,4681.58 ; -2439.06,5471.58 -2399.06,5471.58 -2419.06,5431.58 -2439.06,5471.58
  lines w15: -2512.19,4173.25 8218.83,4173.25 ; -2512.19,5823.25 8218.83,5823.25 ; -1961.31,4023.25 -1961.31,5973.25 ; -1311.48,4023.25 -1311.48,5973.25 ; -161.82,4023.25 -161.82,5973.25 ; 344.06,4023.25 344.06,5973.25 ; 1077.86,4023.25 1077.86,5973.25 ; 2577.41,4023.25 2577.41,5973.25 ; 3167.26,4023.25 3167.26,5973.25 ; 3913.05,4023.25 3913.05,5973.25 ; 4652.85,4023.25 4652.85,5973.25 ; 5506.61,4023.25 5506.61,5973.25 ; 6840.22,4023.25 6840.22,5973.25 ; -2512.19,4023.25 8218.83,4023.25 8218.83,5973.25 -2512.19,5973.25 -2512.19,4023.25
  text "Symbol" at -2422.19,5868.25 h72
  text "Count" at -1916.31,5868.25 h72
  text "Hole Size" at -1266.48,5868.25 h72
  text "Plated" at -116.82,5868.25 h72
  text "Hole Type" at 389.06,5868.25 h72
  text "Drill Layer Pair" at 1122.86,5868.25 h72
  text "Via/Pad" at 2622.41,5868.25 h72
  text "Pad Shape" at 3212.26,5868.25 h72
  text "Template" at 3958.05,5868.25 h72
  text "Description" at 4697.85,5868.25 h72
  text "Hole Tolerance (+)" at 5551.61,5868.25 h72
  text "Hole Tolerance (-)" at 6885.22,5868.25 h72
  text "2" at -1916.31,5718.25 h60
  text "35.43mil (0.900mm)" at -1266.48,5718.25 h60
  text "PTH" at -116.82,5718.25 h60
  text "Round" at 389.06,5718.25 h60
  text "Top Layer - Bottom Layer" at 1122.86,5718.25 h60
  text "Pad" at 2622.41,5718.25 h60
  text "(Mixed)" at 3212.26,5718.25 h60
  text "(Mixed)" at 3958.05,5718.25 h60
  text "2" at -1916.31,5568.25 h60
  text "39.37mil (1.000mm)" at -1266.48,5568.25 h60
  text "NPTH" at -116.82,5568.25 h60
  text "Round" at 389.06,5568.25 h60
  text "Top Layer - Bottom Layer" at 1122.86,5568.25 h60
  text "Pad" at 2622.41,5568.25 h60
  text "Rounded" at 3212.26,5568.25 h60
  text "c0hn100" at 3958.05,5568.25 h60
  text "2" at -1916.31,5418.25 h60
  text "125.00mil (3.175mm)" at -1266.48,5418.25 h60
  text "PTH" at -116.82,5418.25 h60
  text "Round" at 389.06,5418.25 h60
  text "Top Layer - Bottom Layer" at 1122.86,5418.25 h60
  text "Pad" at 2622.41,5418.25 h60
  text "Rounded" at 3212.26,5418.25 h60
  text "c600h318" at 3958.05,5418.25 h60
  text "3" at -1916.31,5268.25 h60
  text "62.99mil (1.600mm)" at -1266.48,5268.25 h60
  text "PTH" at -116.82,5268.25 h60
  text "Round" at 389.06,5268.25 h60
  text "Top Layer - Bottom Layer" at 1122.86,5268.25 h60
  text "Pad" at 2622.41,5268.25 h60
  text "Rounded" at 3212.26,5268.25 h60
  text "c310h160" at 3958.05,5268.25 h60
  text "3" at -1916.31,5118.25 h60
  text "66.14mil (1.680mm)" at -1266.48,5118.25 h60
  text "PTH" at -116.82,5118.25 h60
  text "Round" at 389.06,5118.25 h60
  text "Top Layer - Bottom Layer" at 1122.86,5118.25 h60
  text "Pad" at 2622.41,5118.25 h60
  text "Rounded" at 3212.26,5118.25 h60
  text "c320h168" at 3958.05,5118.25 h60
  text "4" at -1916.31,4968.25 h60
  text "112.21mil (2.850mm)" at -1266.48,4968.25 h60
  text "PTH" at -116.82,4968.25 h60
  text "Round" at 389.06,4968.25 h60
  text "Top Layer - Bottom Layer" at 1122.86,4968.25 h60
  text "Pad" at 2622.41,4968.25 h60
  text "Rounded" at 3212.26,4968.25 h60
  text "c530h285" at 3958.05,4968.25 h60
  text "4" at -1916.31,4818.25 h60
  text "125.98mil (3.200mm)" at -1266.48,4818.25 h60
  text "NPTH" at -116.82,4818.25 h60
  text "Round" at 389.06,4818.25 h60
  text "Top Layer - Bottom Layer" at 1122.86,4818.25 h60
  text "Pad" at 2622.41,4818.25 h60
  text "Rounded" at 3212.26,4818.25 h60
  text "c600hn320" at 3958.05,4818.25 h60
  text "15" at -1916.31,4668.25 h60
  text "10.00mil (0.254mm)" at -1266.48,4668.25 h60
  text "PTH" at -116.82,4668.25 h60
  text "Round" at 389.06,4668.25 h60
  text "Top Layer - Bottom Layer" at 1122.86,4668.25 h60
  text "Via" at 2622.41,4668.25 h60
  text "Rounded" at 3212.26,4668.25 h60
  text "v61h25m0mx0" at 3958.05,4668.25 h60
  text "15" at -1916.31,4518.25 h60
  text "64.96mil (1.650mm)" at -1266.48,4518.25 h60
  text "PTH" at -116.82,4518.25 h60
  text "Round" at 389.06,4518.25 h60
  text "Top Layer - Bottom Layer" at 1122.86,4518.25 h60
  text "Pad" at 2622.41,4518.25 h60
  text "Rounded" at 3212.26,4518.25 h60
  text "c220h165" at 3958.05,4518.25 h60
  text "25" at -1916.31,4368.25 h60
  text "40.00mil (1.016mm)" at -1266.48,4368.25 h60
  text "PTH" at -116.82,4368.25 h60
  text "Round" at 389.06,4368.25 h60
  text "Top Layer - Bottom Layer" at 1122.86,4368.25 h60
  text "Pad" at 2622.41,4368.25 h60
  text "(Mixed)" at 3212.26,4368.25 h60
  text "(Mixed)" at 3958.05,4368.25 h60
  text "1495" at -1916.31,4218.25 h60
  text "12.00mil (0.305mm)" at -1266.48,4218.25 h60
  text "PTH" at -116.82,4218.25 h60
  text "Round" at 389.06,4218.25 h60
  text "Top Layer - Bottom Layer" at 1122.86,4218.25 h60
  text "(Mixed)" at 2622.41,4218.25 h60
  text "Rounded" at 3212.26,4218.25 h60
  text "(Mixed)" at 3958.05,4218.25 h60
  text "1570 Total" at -1916.31,4068.25 h60

## Text inside footprints (layer, text, board x,y; h text height)
U3: Top Overlay "A1" at 2742.22,-3684.95 h30
U4: Top Overlay "A1" at 2742.22,-3133.76 h30